# Altium PCB ELF 2 & ELF 2_Lite V1.3.PcbDoc (part 2 of 8)
Units mm, origin at the board's own origin, x right, y up, seen from the top; angles counter-clockwise.
Board outline 120 x 75 mm, 4 copper layers (01 TOP, 02 GND, 03 Signal, 04 BOT), stack 0.603 mm thick; 470 components, 412 nets, 2075 pads, 1565 vias.
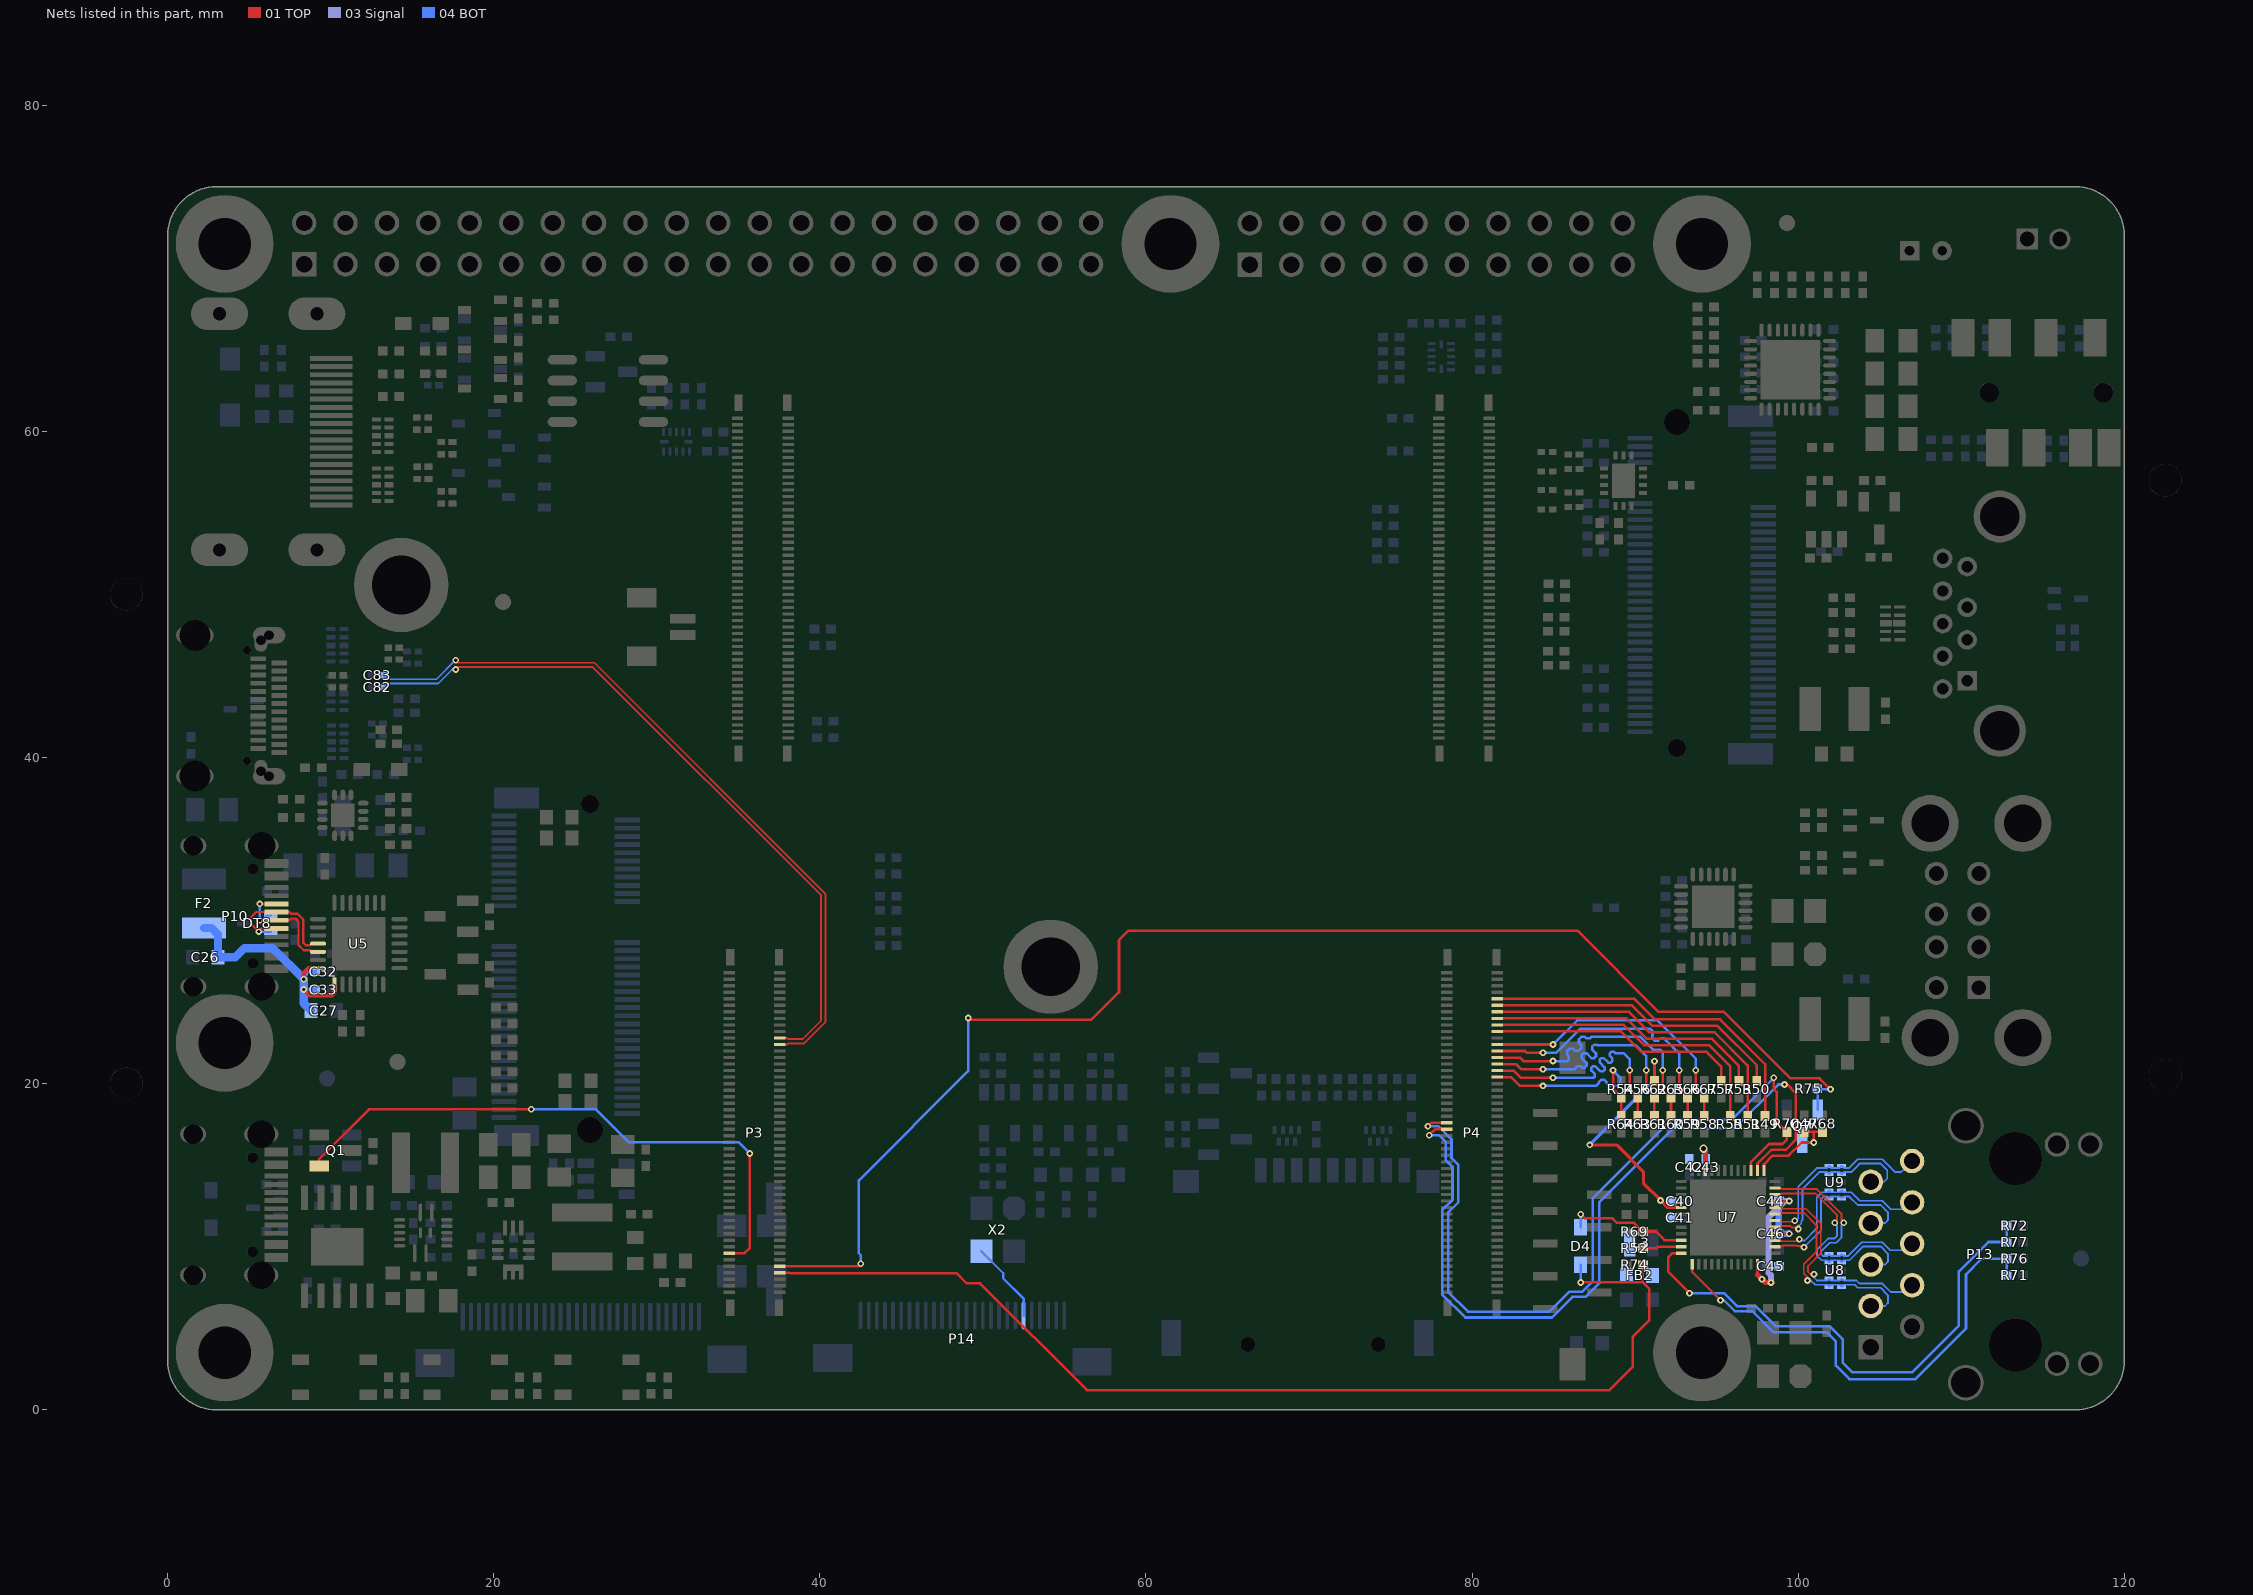
[diagram p4: the nets of this part, all layers, seen from the top]

## Footprints (in the part's own frame and the unit in brackets; to place one, negate y for a bottom-side part, rotate by r counter-clockwise, add the part's x,y. Pads: shape width x height; smd on the part's side, far side on the other; paste and mask are expansions set on the pad) (continued)
QFN48-0_4-6X6-PH1_0 [mm] "QFN, 48-Leads, Body 6.00x6.00mm, Pitch 0.40mm, Thermal Pad 4.80x4.80mm, IPC Medium Density"
  rect 0.65x0.2 smd mask+0.05: 1(-2.876,2.2) 2(-2.876,1.8) 3(-2.876,1.4) 4(-2.876,1) 5(-2.876,0.6) 6(-2.876,0.2) 7(-2.876,-0.2) 8(-2.876,-0.6) 9(-2.876,-1) 10(-2.876,-1.4) 11(-2.876,-1.8) 12(-2.876,-2.2) 25(2.876,-2.2) 26(2.876,-1.8) 27(2.876,-1.4) 28(2.876,-1) 29(2.876,-0.6) 30(2.876,-0.2) 31(2.876,0.2) 32(2.876,0.6) 33(2.876,1) 34(2.876,1.4) 35(2.876,1.8) 36(2.876,2.2)
  rect 0.2x0.65 smd mask+0.05: 13(-2.2,-2.875) 14(-1.8,-2.875) 15(-1.4,-2.875) 16(-1,-2.875) 17(-0.6,-2.875) 18(-0.2,-2.875) 19(0.2,-2.875) 20(0.6,-2.875) 21(1,-2.875) 22(1.4,-2.875) 23(1.8,-2.875) 24(2.2,-2.875) 37(2.2,2.875) 38(1.8,2.875) 39(1.4,2.875) 40(1,2.875) 41(0.6,2.875) 42(0.2,2.875) 43(-0.2,2.875) 44(-0.6,2.875) 45(-1,2.875) 46(-1.4,2.875) 47(-1.8,2.875) 48(-2.2,2.875)
  rect 4.65x4.65 smd mask+0.05: 49(0,0)
  silkscreen extent -4.2,-4.24 4.23,4.22, body extent -3.01,-3.01 3.01,3.01, height 0.85
QFN_2*3 [mm]
  rect 0.7x0.25 smd paste+0 mask+0.05: 1(-0.95,0.5) 2(-0.95,0) 3(-0.95,-0.5) 7(0.95,-0.5) 8(0.95,0) 9(0.95,0.5)
  rect 0.25x0.9 smd paste+0 mask+0.05: 4(-0.5,-1.35) 5(0,-1.35) 6(0.5,-1.35) 10(-0.5,1.35) 10(0,1.35) 10(0.5,1.35)
  rect 0.4x0.25 smd paste+0 mask+0.05: 8(0,0)
  rect 1.25x0.4 smd paste+0 mask+0.05: 10(0,1.1)
  silkscreen extent -1.78,-1.73 1.23,1.73
"QR Code" [mm]
  silkscreen extent -3.18,-3.18 3.18,3.18
RJ45_Gigabit [mm]
  rect 1.5x1.5 hole 1 mask+0.05: 1(5.715,-6.35)
  round 1.5 hole 1 mask+0.05: 2(4.445,-3.81) 3(3.175,-6.35) 4(1.905,-3.81) 5(0.635,-6.35) 6(-0.635,-3.81) 7(-1.905,-6.35) 8(-3.175,-3.81) 9(-4.445,-6.35) 10(-5.715,-3.81)
  round 1.5 hole 1.1 mask+0.05: 11(6.725,5.08) 12(6.725,7.11) 13(-6.725,5.08) 14(-6.725,7.11)
  round 2.2 hole 1.8 mask+0.05: SH1(7.875,-0.51) SH2(-7.875,-0.51)
  round 3.25 hole 3.25 unplated paste-2539.97 mask+0.05: ""(-5.875,2.54) ""(5.555,2.54)
  silkscreen extent -7.98,-8.01 7.98,13.34, body extent -8.12,-8.01 8.12,13.34, height 13.65
SOCKET_100PIN_0.4MM_F [mm]
  rect 0.2x0.7 smd mask+0.05: 1(-9.8,-1.55) 2(-9.8,1.55) 3(-9.4,-1.55) 4(-9.4,1.55) 5(-9,-1.55) 6(-9,1.55) 7(-8.6,-1.55) 8(-8.6,1.55) 9(-8.2,-1.55) 10(-8.2,1.55) 11(-7.8,-1.55) 12(-7.8,1.55) 13(-7.4,-1.55) 14(-7.4,1.55) 15(-7,-1.55) 16(-7,1.55) 17(-6.6,-1.55) 18(-6.6,1.55) 19(-6.2,-1.55) 20(-6.2,1.55) 21(-5.8,-1.55) 22(-5.8,1.55) 23(-5.4,-1.55) 24(-5.4,1.55) 25(-5,-1.55) 26(-5,1.55) 27(-4.6,-1.55) 28(-4.6,1.55) 29(-4.2,-1.55) 30(-4.2,1.55) 31(-3.8,-1.55) 32(-3.8,1.55) 33(-3.4,-1.55) 34(-3.4,1.55) 35(-3,-1.55) 36(-3,1.55) 37(-2.6,-1.55) 38(-2.6,1.55) 39(-2.2,-1.55) 40(-2.2,1.55) 41(-1.8,-1.55) 42(-1.8,1.55) 43(-1.4,-1.55) 44(-1.4,1.55) 45(-1,-1.55) 46(-1,1.55) 47(-0.6,-1.55) 48(-0.6,1.55) 49(-0.2,-1.55) 50(-0.2,1.55) 51(0.2,-1.55) 52(0.2,1.55) 53(0.6,-1.55) 54(0.6,1.55) 55(1,-1.55) 56(1,1.55) 57(1.4,-1.55) 58(1.4,1.55) 59(1.8,-1.55) 60(1.8,1.55) 61(2.2,-1.55) 62(2.2,1.55) 63(2.6,-1.55) 64(2.6,1.55) 65(3,-1.55) 66(3,1.55) 67(3.4,-1.55) 68(3.4,1.55) 69(3.8,-1.55) 70(3.8,1.55) 71(4.2,-1.55) 72(4.2,1.55) 73(4.6,-1.55) 74(4.6,1.55) 75(5,-1.55) 76(5,1.55) 77(5.4,-1.55) 78(5.4,1.55) 79(5.8,-1.55) 80(5.8,1.55) 81(6.2,-1.55) 82(6.2,1.55) 83(6.6,-1.55) 84(6.6,1.55) 85(7,-1.55) 86(7,1.55) 87(7.4,-1.55) 88(7.4,1.55) 89(7.8,-1.55) 90(7.8,1.55) 91(8.2,-1.55) 92(8.2,1.55) 93(8.6,-1.55) 94(8.6,1.55) 95(9,-1.55) 96(9,1.55) 97(9.4,-1.55) 98(9.4,1.55) 99(9.8,-1.55) 100(9.8,1.55)
  rect 1x0.5 smd mask+0.05: 101(-10.75,-1.5) 102(-10.75,1.5) 103(10.75,-1.5) 104(10.75,1.5)
  silkscreen extent -11.55,-2.97 11.55,2.97
SOD_123 [mm]
  rect 1.4x1.2 smd mask+0.05: 1(-1.714,0) 2(1.714,0)
  silkscreen extent -1.08,-1.14 1.88,1.25, body extent -1.85,-0.8 1.85,0.8, height 1.27
SOD_323 [mm]
  rect 1x0.8 smd mask+0.05: 1(-1.15,0) 2(1.15,0)
  silkscreen extent -1,-0.91 1.59,1.02, body extent -1.3,-0.67 1.3,0.67, height 1.1
SOD_323_D [mm]
  rect 1x0.8 smd mask+0.05: 1(-1.15,0) 2(1.15,0)
  silkscreen extent -1,-0.75 1.13,0.75, body extent -1.3,-0.67 1.3,0.67, height 1.1
SOP8_1.27-7.2x4-h2.65 [mm]
  oval 1.8x0.6 smd mask+0.05: 1(-2.794,1.905) 2(-2.794,0.635) 3(-2.794,-0.635) 4(-2.794,-1.905) 5(2.794,-1.905) 6(2.794,-0.635) 7(2.794,0.635) 8(2.794,1.905)
  silkscreen extent -3.03,-3.6 2,3.6
SOT323 [mm]
  rect 0.5x0.8 smd mask+0.05: 1(0.65,1.1) 2(-0.65,1.1) 3(0,-1.1)
  silkscreen extent -1.1,-0.67 1.1,0.69
SOT_233_N [mm]
  rect 1.2x0.65 smd mask+0.05: 1(-1,0.95) 2(-1,-0.95) 3(1,0)
  silkscreen extent -2.22,-1.46 1.14,1.46, body extent -1.26,-1.46 1.24,1.54, height 1.12
SOT_233_W [mm]
  rect 1.3x0.65 smd mask+0.05: 1(-1,0.95) 2(-1,-0.95) 3(1,0)
  silkscreen extent -2.3,-1.5 0.7,1.5, body extent -1.25,-1.5 1.25,1.5, height 1.12
SOT_235 [mm]
  rect 1x0.6 smd mask+0.05: 1(-1.25,0.95) 2(-1.25,0) 3(-1.25,-0.95) 4(1.25,-0.95) 5(1.25,0.95)
  silkscreen extent -1.71,-1.5 0.45,1.65, body extent -1.12,-1.45 1.22,1.47, height 1
SOT_323 [mm]
  rect 0.5x0.8 smd mask+0.05: 1(0.65,1.1) 2(-0.65,1.1) 3(0,-1.1)
  silkscreen extent -1.1,-0.67 1.1,0.67
SOT_523 [mm] "SOT23, 3-Leads, Body 1.7x1.8mm (max), Pitch 0.50mm, IPC Medium Density"
  rect 0.85x0.4 smd mask+0.051: 1(-0.825,0.5) 2(-0.825,-0.5) 3(0.825,0)
  silkscreen extent -1.84,-0.85 0.43,0.85, body extent -0.8,-0.8 0.8,0.8, height 0.8
TF_CARD_SELF [mm]
  rect 1.4x1.4 smd mask+0.05: 0(-8,4.688)
  rect 1.2x2.2 smd mask+0.05: 0(-7.75,-4.912) 0(7.75,-4.912)
  rect 1.6x1.4 smd mask+0.05: 0(6.85,4.688)
  rect 0.7x1.5 smd mask+0.05: 1(2.25,5.388) 2(1.15,5.388) 3(0.05,5.388) 4(-1.05,5.388) 5(-2.15,5.388) 6(-3.25,5.388) 7(-4.35,5.388) 8(-5.45,5.388) 9(-6.55,5.388)
  round 0.9 hole 0.9 unplated mask+0.051: ""(-4.95,-5.312) ""(3.05,-5.312)
  01 TOP pour cut-out: 3.023,-3.099 3.023,3.961 3.05,3.988 -6.9,3.988 -6.9,-3.099
  01 TOP pour cut-out: 4.229,-1.956 6.579,-1.956 6.579,3.124 4.305,3.124 4.229,3.124
  01 TOP pour cut-out: 6.35,-11.684 6.35,-2.718 6.325,-2.692 5.042,-2.692 5.042,-11.684
  silkscreen extent -7.37,-16.11 7.41,5.21, body extent -8.05,-9.31 8.05,5.69, height 1.9
UQFN [mm]
  rect 0.5x0.2 smd mask+0.05: 1(-0.6,0.8) 2(-0.6,0.4) 3(-0.6,0) 4(-0.6,-0.4) 5(-0.6,-0.8) 7(0.6,-0.8) 8(0.6,-0.4) 9(0.6,0) 10(0.6,0.4) 11(0.6,0.8)
  rect 0.2x0.5 smd mask+0.05: 6(0,-0.75) 12(0,0.75)
  01 TOP region: -0.85,0.7 -0.35,0.7 -0.35,1 -0.5,1 -0.5,0.9 -0.85,0.9
  silkscreen extent -1.54,-1.24 1.1,1.24, body extent -0.9,-1.05 0.9,1.05, height 0.55
USB3.0_A-11.78 [mm]
  round 3.2 hole 2.4 slot 2.3 at 90 deg mask+0.05: 0(-6.57,1.75) 0(6.57,1.75)
  rect 1.2x1.2 hole 0.7 mask+0.05: 1(3.5,-0.25)
  round 1.2 hole 0.7 mask+0.05: 2(1,-0.25) 3(-1,-0.25) 4(-3.5,-0.25) 5(-4,-1.75) 6(-2,-1.75) 7(0,-1.75) 8(2,-1.75) 9(4,-1.75)
  silkscreen extent -7.17,-2.97 7.17,13.53, body extent -8.04,-3.01 8.06,13.47, height 7.62
USB_A_F_W_2 [mm] "T_MMMC_896-43-008-90-000000"
  rect 1.4x1.4 hole 0.9 mask+0.05: 1(-3.5,-0.14)
  round 1.42 hole 0.92 mask+0.05: 2(-1,-0.14) 3(1,-0.14) 4(3.5,-0.14) 5(-3.5,2.46) 6(-1,2.46) 7(1,2.46) 8(3.5,2.46)
  round 3.5 hole 2.3 mask+0.05: 9(-6.57,-2.84) 10(6.57,-2.84) 11(-6.57,2.84) 12(6.57,2.84)
  silkscreen extent -6.38,-13.2 6.38,4.46, body extent -7.7,-13.27 7.7,4.26, height 16.17
USB_TYPE-C_S [mm]
  rect 0.55x1.45 smd mask+0.05: A1/B12(-3.225,2.548) A4/B9(-2.45,2.548) B1/A12(3.225,2.548) B4/A9(2.45,2.548)
  rect 0.3x1.45 smd mask+0.05: A5(-1.25,2.548) A6(-0.25,2.548) A7(0.25,2.548) A8(1.25,2.548) B5(1.75,2.548) B6(0.75,2.548) B7(-0.75,2.548) B8(-1.75,2.548)
  oval 1x2.1 hole 1.7 slot 0.6 at 0 deg mask+0.05: E1(-4.32,1.632) E2(4.32,1.632)
  oval 1x1.6 hole 1.2 slot 0.6 at 0 deg mask+0.05: E3(-4.32,-2.548) E4(4.32,-2.548)
  round 0.65 hole 0.65 unplated mask+0.05: H1(-2.89,1.102) H2(2.89,1.102)
  silkscreen extent -4.47,-5.15 4.47,0.25, body extent -4.47,-5.15 4.47,2.75, height 3.2
USB_TYPEC_SMT [mm] "韩国韩荣，TYPE-C-31-M-05"
  rect 0.3x0.95 smd mask+0.05: A1(-2.63,2.588) A2(-2.13,2.588) A3(-1.63,2.588) A4(-1.13,2.588) A5(-0.63,2.588) A6(-0.13,2.588) A7(0.37,2.588) A8(0.87,2.588) A9(1.37,2.588) A10(1.87,2.588) A11(2.37,2.588) A12(2.87,2.588) B1(2.62,1.288) B2(2.12,1.288) B3(1.62,1.288) B4(1.12,1.288) B5(0.62,1.288) B6(0.12,1.288) B7(-0.38,1.288) B8(-0.88,1.288) B9(-1.38,1.288) B10(-1.88,1.288) B11(-2.38,1.288) B12(-2.88,1.288)
  oval 1x2 hole 0.6 slot 1.6 at 90 deg mask+0.05: E1(-4.32,1.963) E2(4.32,1.963)
  oval 1.4x0.8 hole 0.6 slot 1.2 at 0 deg mask+0.05: E1(-4.02,1.462) E2(4.02,1.462)
  oval 1x2.3 hole 1.9 slot 0.6 at 0 deg mask+0.05: E3(-4.32,-2.588) E4(4.32,-2.588)
  round 0.5 hole 0.5 unplated mask+0.05: H1(-3.4,0.613) H2(3.4,0.613)
  silkscreen extent -4.47,-5.29 4.47,2.62
USON-10 [mm]
  rect 0.25x0.55 smd mask+0.05: 1(-1,-0.385) 2(-0.5,-0.385) 4(0.5,-0.385) 5(1,-0.385) 6(1,0.385) 7(0.5,0.385) 9(-0.5,0.385) 10(-1,0.385)
  rect 0.35x0.55 smd mask+0.05: 3(0,-0.385) 8(0,0.385)
  silkscreen extent -1.33,-1.11 1.33,0.57, body extent -1.25,-0.5 1.25,0.5, height 0.55
WQFN14_0.5_2.5x2.5 [mm] "QFN, 14-Leads, Body 2.50x2.50mm, Pitch 0.50mm, Thermal Pad 1.45x1.45mm, IPC Medium Density"
  oval 0.65x0.3 smd mask+0.05: 1(-1.25,0.5) 2(-1.25,0) 3(-1.25,-0.5) 8(1.25,-0.5) 9(1.25,0) 10(1.25,0.5)
  oval 0.3x0.65 smd mask+0.05: 4(-0.75,-1.25) 5(-0.25,-1.25) 6(0.25,-1.25) 7(0.75,-1.25) 11(0.75,1.25) 12(0.25,1.25) 13(-0.25,1.25) 14(-0.75,1.25)
  rect 1.45x1.45 smd mask+0.05: 15(0,0)
  silkscreen extent -1.91,-1.4 1.4,1.4, body extent -1.25,-1.25 1.25,1.25, height 0.15

## Part data
C1 C2: library part 1110205018, LatestRevisionDate=17-Jul-2002, LatestRevisionNote="Re-released for DXP Platform.", PackageDescription="Radial Cap, Thru-Hole; 2 Leads; 0.3 in Pin Spacing", PackageReference=RAD-0.3, Published=8-Jun-2000, Publisher="Altium Limited", 存货名称=贴装叠层陶瓷电容, 存货编码=1110205018, 序号=747, 料号建立日期=2019/7/2, 最近一次购买记录=2025/1/10, 禁用=否, 规格型号=1206,22uF,25V,±10％,X5R, 近三年购买频次=近三年购买频次.30
C3 C9 C13 C14 C15 C23 C24: library part 1110204012, LatestRevisionDate=17-Jul-2002, LatestRevisionNote="Re-released for DXP Platform.", PackageDescription="Radial Cap, Thru-Hole; 2 Leads; 0.3 in Pin Spacing", PackageReference=RAD-0.3, Published=8-Jun-2000, Publisher="Altium Limited", 存货名称=贴装叠层陶瓷电容, 存货编码=1110204012, 序号=747, 规格型号=0805,22uF,16V,±20％,X5R
  C3 C9 C13 C14 C15: 禁用状态=否
  C23 C24: 主计量单位名称=个, 安全库存=6299, 旧编码=010203017, 旧规格型号="0805 22uF 16V ±20％ X5R"
C4 C21 C25 C26 C27 C110 C123 C124: library part 1110203040, LatestRevisionDate=17-Jul-2002, LatestRevisionNote="Re-released for DXP Platform.", PackageDescription="Radial Cap, Thru-Hole; 2 Leads; 0.3 in Pin Spacing", PackageReference=RAD-0.3, Published=8-Jun-2000, Publisher="Altium Limited", 存货名称=贴装叠层陶瓷电容, 存货编码=1110203040, 序号=675, 规格型号=0603,22uF,6.3V,±20％,X5R
  C4 C21 C25 C26 C27 C110: 主计量单位名称=个, 安全库存=678357, 旧编码=010202048, 旧规格型号="0603 22uF 6.3V ±20％ X5R"
C5 C6 C7 C19 C53 C54 C55 C57 C61 C62 C76 C90 C92 C105 C106 C108 C109 C115 C116 C117 C142: library part 1110202021, LatestRevisionDate=17-Jul-2002, LatestRevisionNote="Re-released for DXP Platform.", PackageDescription="Radial Cap, Thru-Hole; 2 Leads; 0.3 in Pin Spacing", PackageReference=RAD-0.3, Published=8-Jun-2000, Publisher="Altium Limited", 存货名称=贴装叠层陶瓷电容, 存货编码=1110202021, 序号=600, 规格型号=0402,1uF,16V,±10％,X5R
C8 C118: library part 1110202042, LatestRevisionDate=17-Jul-2002, LatestRevisionNote="Re-released for DXP Platform.", PackageDescription="Radial Cap, Thru-Hole; 2 Leads; 0.3 in Pin Spacing", PackageReference=RAD-0.3, Published=8-Jun-2000, Publisher="Altium Limited", 存货名称=贴装叠层陶瓷电容, 存货编码=1110202042, 规格型号=0402,220nF,25V,±10％,X5R
C10: library part 1110203025, LatestRevisionDate=17-Jul-2002, LatestRevisionNote="Re-released for DXP Platform.", PackageDescription="Radial Cap, Thru-Hole; 2 Leads; 0.3 in Pin Spacing", PackageReference=RAD-0.3, Published=8-Jun-2000, Publisher="Altium Limited", 存货名称=贴装叠层陶瓷电容, 存货编码=1110203025, 序号=648, 描述=替代010202065, 料号建立日期=2019/7/2, 最近一次购买记录(更新至20231207）=2023/10/23, 禁用=#REF!, 规格型号=0603,1uF,25V,±10％,X5R, 近三年购买频次（更新至2023/12/7）=近三年购买频次,35
C11 C12 C17 C18 C20 C22 C28 C29 C35 C37 C39 C41 C43 C44 C45 C46 C47 C52 C77 C81 C91 C93 C95 C97 C99 C101 C113 C119 C120 C121 C128 C130 C131 C134 C135 C136 C137 C138 C139 C140 C143: library part 1110202039, LatestRevisionDate=17-Jul-2002, LatestRevisionNote="Re-released for DXP Platform.", PackageDescription="Radial Cap, Thru-Hole; 2 Leads; 0.3 in Pin Spacing", PackageReference=RAD-0.3, Published=8-Jun-2000, Publisher="Altium Limited", 存货名称=贴装叠层陶瓷电容, 存货编码=1110202039, 规格型号=0402,100nF,25V,±10％,X5R
  C11 C12 C17 C18 C20 C22 C28 C29 C35 C37 C39 C41 C43 C44 C45 C46 C47 C52 C77 C81 C91 C93 C95 C97 C99 C101 C113 C119 C120 C134 C140 C143: 序号=626
  C121 C128 C130 C131 C135 C136 C137 C138 C139: 序号=618, 禁用状态=否
C16 C71: library part 1110202016, LatestRevisionDate=17-Jul-2002, LatestRevisionNote="Re-released for DXP Platform.", PackageDescription="Radial Cap, Thru-Hole; 2 Leads; 0.3 in Pin Spacing", PackageReference=RAD-0.3, Published=8-Jun-2000, Publisher="Altium Limited", 存货名称=贴装叠层陶瓷电容, 存货编码=1110202016, 序号=587, 规格型号=0402,100pF,50V,±5％,NPO
C30 C33: library part 1110202002, LatestRevisionDate=17-Jul-2002, LatestRevisionNote="Re-released for DXP Platform.", PackageDescription="Radial Cap, Thru-Hole; 2 Leads; 0.3 in Pin Spacing", PackageReference=RAD-0.3, Published=8-Jun-2000, Publisher="Altium Limited", 主计量单位名称=个, 存货名称=贴装叠层陶瓷电容, 存货编码=1110202002, 安全库存=499709, 序号=571, 旧编码=010201002, 旧规格型号="0402 1uF 10V ±10％ X5R", 规格型号=0402,1uF,10V,±10％,X5R
C31 C32 C34 C50 C56 C58 C59 C60 C132 C133 C150 C151 C152 C153: library part 1110202001, LatestRevisionDate=17-Jul-2002, LatestRevisionNote="Re-released for DXP Platform.", PackageDescription="Radial Cap, Thru-Hole; 2 Leads; 0.3 in Pin Spacing", PackageReference=RAD-0.3, Published=8-Jun-2000, Publisher="Altium Limited", 存货名称=贴装叠层陶瓷电容, 存货编码=1110202001, 序号=570, 规格型号=0402,100nF,16V,±10％,X7R
  C31 C32 C34 C50 C56 C58 C59 C60 C150 C151 C152 C153: 主计量单位名称=个, 安全库存=2580445, 旧编码=010201001, 旧规格型号="0402 100nF 16V ±10％ X7R"
  C132 C133: 禁用状态=否
C36 C38 C40 C42 C94 C96 C98 C100 C112 C114: library part 1110202032, LatestRevisionDate=17-Jul-2002, LatestRevisionNote="Re-released for DXP Platform.", PackageDescription="Radial Cap, Thru-Hole; 2 Leads; 0.3 in Pin Spacing", PackageReference=RAD-0.3, Published=8-Jun-2000, Publisher="Altium Limited", 存货名称=贴装叠层陶瓷电容, 存货编码=1110202032, 序号=616, 规格型号=0402,4.7uF,10V,±10％,X5R
C48 C49: library part 1110202003, LatestRevisionDate=17-Jul-2002, LatestRevisionNote="Re-released for DXP Platform.", PackageDescription="Radial Cap, Thru-Hole; 2 Leads; 0.3 in Pin Spacing", PackageReference=RAD-0.3, Published=8-Jun-2000, Publisher="Altium Limited", 存货名称=贴装叠层陶瓷电容, 存货编码=1110202003, 序号=572, 禁用状态=否, 规格型号=0402,22pF,50V,±5％,NPO
C51: library part 1110203037, LatestRevisionDate=17-Jul-2002, LatestRevisionNote="Re-released for DXP Platform.", PackageDescription="Radial Cap, Thru-Hole; 2 Leads; 0.3 in Pin Spacing", PackageReference=RAD-0.3, Published=8-Jun-2000, Publisher="Altium Limited", 存货名称=贴装叠层陶瓷电容, 存货编码=1110203037, 序号=672, 规格型号=0603,10uF,10V,±20％,X5R
C63 C64 C65 C66 C67 C68 C69 C70: library part 1110201001, LatestRevisionDate=17-Jul-2002, LatestRevisionNote="Re-released for DXP Platform.", PackageDescription="Radial Cap, Thru-Hole; 2 Leads; 0.3 in Pin Spacing", PackageReference=RAD-0.3, Published=8-Jun-2000, Publisher="Altium Limited", 存货名称=贴装叠层陶瓷电容, 存货编码=1110201001, 序号=928, 规格型号=0201,220nF,6.3V,±20％,X5R
C72 C73: library part 1110201015, LatestRevisionDate=17-Jul-2002, LatestRevisionNote="Re-released for DXP Platform.", PackageDescription="Radial Cap, Thru-Hole; 2 Leads; 0.3 in Pin Spacing", PackageReference=RAD-0.3, Published=8-Jun-2000, Publisher="Altium Limited", 存货名称=贴装叠层陶瓷电容, 存货编码=1110201015, 规格型号=0201,1uF,10V,±20％,X5R
C74: library part 1110203058, LatestRevisionDate=17-Jul-2002, LatestRevisionNote="Re-released for DXP Platform.", PackageDescription="Radial Cap, Thru-Hole; 2 Leads; 0.3 in Pin Spacing", PackageReference=RAD-0.3, Published=8-Jun-2000, Publisher="Altium Limited", 存货名称=贴装叠层陶瓷电容, 存货编码=1110203058, 序号=707, 禁用状态=否, 规格型号=0603,10uF,10V,±10％,X5R
C75: library part 1110203001, LatestRevisionDate=17-Jul-2002, LatestRevisionNote="Re-released for DXP Platform.", PackageDescription="Radial Cap, Thru-Hole; 2 Leads; 0.3 in Pin Spacing", PackageReference=RAD-0.3, Published=8-Jun-2000, Publisher="Altium Limited", 存货名称=贴装叠层陶瓷电容, 存货编码=1110203001, 序号=628, 禁用状态=否, 规格型号=0603,100nF,50V,±10％,X7R
C78 C79 C80: library part 1110204014, LatestRevisionDate=17-Jul-2002, LatestRevisionNote="Re-released for DXP Platform.", PackageDescription="Radial Cap, Thru-Hole; 2 Leads; 0.3 in Pin Spacing", PackageReference=RAD-0.3, Published=8-Jun-2000, Publisher="Altium Limited", 存货名称=贴装叠层陶瓷电容, 存货编码=1110204014, 序号=751, 规格型号=0805,22uF,25V,±20％,X5R
C82 C83 C86 C87 C88 C89: library part 1110201009, LatestRevisionDate=17-Jul-2002, LatestRevisionNote="Re-released for DXP Platform.", PackageDescription="Radial Cap, Thru-Hole; 2 Leads; 0.3 in Pin Spacing", PackageReference=RAD-0.3, Published=8-Jun-2000, Publisher="Altium Limited", 存货名称=贴装叠层陶瓷电容, 存货编码=1110201009, 规格型号=0201,100nF,25V,±10％,X5R
C84 C85: library part 1110202017, LatestRevisionDate=17-Jul-2002, LatestRevisionNote="Re-released for DXP Platform.", PackageDescription="Radial Cap, Thru-Hole; 2 Leads; 0.3 in Pin Spacing", PackageReference=RAD-0.3, Published=8-Jun-2000, Publisher="Altium Limited", 存货名称=贴装叠层陶瓷电容, 存货编码=1110202017, 序号=588, 规格型号=0402,220pF,50V,±10％,X7R
C102 C103: library part 1110202045, LatestRevisionDate=17-Jul-2002, LatestRevisionNote="Re-released for DXP Platform.", PackageDescription="Radial Cap, Thru-Hole; 2 Leads; 0.3 in Pin Spacing", PackageReference=RAD-0.3, Published=8-Jun-2000, Publisher="Altium Limited", 存货名称=贴装叠层陶瓷电容, 存货编码=1110202045, 规格型号=0402,30pF,50V,±5%,NPO
C104 C107 C111 C122: library part 1110204008, LatestRevisionDate=17-Jul-2002, LatestRevisionNote="Re-released for DXP Platform.", PackageDescription="Radial Cap, Thru-Hole; 2 Leads; 0.3 in Pin Spacing", PackageReference=RAD-0.3, Published=8-Jun-2000, Publisher="Altium Limited", 存货名称=贴装叠层陶瓷电容, 存货编码=1110204008, 序号=711, 料号建立日期=2019/7/2, 最近一次购买记录(更新至20231207）=2023/11/15, 禁用=#REF!, 规格型号=0805,47uF,6.3V,±20％,X5R, 近三年购买频次（更新至2023/12/7）=近三年购买频次,41
C125 C127 C129: library part 1110203089, LatestRevisionDate=17-Jul-2002, LatestRevisionNote="Re-released for DXP Platform.", PackageDescription="Radial Cap, Thru-Hole; 2 Leads; 0.3 in Pin Spacing", PackageReference=RAD-0.3, Published=8-Jun-2000, Publisher="Altium Limited", 存货名称=贴装叠层陶瓷电容, 存货编码=1110203089, 序号=5456, 描述=FH/广东风华高新科技股份有限公司, 料号建立日期=2023/6/9, 最近一次购买记录(更新至20231207）=2023/11/8, 禁用=#REF!, 规格型号=0603,10uF,10V,±10％,X5R,0603X106K100NT, 近三年购买频次（更新至2023/12/7）=近三年购买频次,12
C126: library part 1110202014, LatestRevisionDate=17-Jul-2002, LatestRevisionNote="Re-released for DXP Platform.", PackageDescription="Radial Cap, Thru-Hole; 2 Leads; 0.3 in Pin Spacing", PackageReference=RAD-0.3, Published=8-Jun-2000, Publisher="Altium Limited", 存货名称=贴装叠层陶瓷电容, 存货编码=1110202014, 序号=593, 禁用状态=否, 规格型号=0402,10nF,50V,±10％,X7R
C141: library part 1110211010, LatestRevisionDate=17-Jul-2002, LatestRevisionNote="Re-released for DXP Platform.", PackageDescription="Polarized Capacitor (Radial); 2 Leads", PackageReference=RB7.6-15, Published=8-Jun-2000, Publisher="Altium Limited", 存货名称=贴装铝电解电容, 存货编码=1110211010, 序号=4743, 料号建立日期=2022/9/2, 最近一次购买记录=2024/12/25, 禁用=否, 规格型号=220uF,16V,6.3*7.7mm,CS1C221M-CRE77, 近三年购买频次=近三年购买频次.19
D2: library part 1110504013, LatestRevisionDate=17-Jul-2002, LatestRevisionNote="Re-released for DXP Platform.", PackageDescription="SM LED; 2 Flat Leads", PackageReference=3.2X1.6X1.1, PackageVersion=Feb-2002, Published=8-Jun-2000, Publisher="Altium Limited", 存货名称=贴装发光二极管, 存货编码=1110504013, 序号=1825, 禁用状态=否, 规格型号=0603,透明,翠绿色发光,普通亮度
D3: library part 1110501005, 存货名称=双肖特基二极管, 存货编码=1110501005, 安全库存=3634, 序号=2485, 旧编码=010601007, 旧规格型号=BAT54C，SOT-23-3, 规格型号=BAT54C,SOT-23-3
D4 D8: library part 1110501028, Code_JEDEC=DO-214-AA, LatestRevisionDate=17-Jul-2002, LatestRevisionNote="Re-released for DXP Platform.", PackageDescription="DO-214-AA/SMB; 2 C-Bend Leads; Body 5.3 x 3.6 mm, inc. leads (LxW)", PackageReference=SMB, Published=8-Jun-2000, Publisher="Altium Limited", 存货名称=肖特基二极管, 存货编码=1110501028, 序号=2525, 规格型号=BAT54HT1G,SOD323
D5: library part 1110501064, Code_JEDEC=DO-214-AA, LatestRevisionDate=17-Jul-2002, LatestRevisionNote="Re-released for DXP Platform.", PackageDescription="DO-214-AA/SMB; 2 C-Bend Leads; Body 5.3 x 3.6 mm, inc. leads (LxW)", PackageReference=SMB, Published=8-Jun-2000, Publisher="Altium Limited", 存货名称=肖特基二极管, 存货编码=1110501064, 规格型号=LMBR140ET1G,SOD323
D7: library part 1110501001, Code_JEDEC=DO-214-AA, LatestRevisionDate=17-Jul-2002, LatestRevisionNote="Re-released for DXP Platform.", PackageDescription="DO-214-AA/SMB; 2 C-Bend Leads; Body 5.3 x 3.6 mm, inc. leads (LxW)", PackageReference=SMB, Published=8-Jun-2000, Publisher="Altium Limited", 存货名称=肖特基二极管, 存货编码=1110501001, 序号=2480, 规格型号=MBR0540,SOD123
DT1: library part 1110503088, 存货名称=TVS管, 存货编码=1110503088, 序号=7697, 描述=LT品牌,替代1110503028, 料号建立日期=2024/12/6, 最近一次购买记录=2025/2/20, 禁用=否, 规格型号=PSD15C,SOD-323, 近三年购买频次=近三年购买频次.3
DT2 DT8 DT19 DT28 DT29 DT33: library part 1110503016, 存货名称=TVS管, 存货编码=1110503016, 序号=2598
  DT2 DT8 DT28 DT29: 主计量单位名称=只, 启用日期=2013/1/1, 安全库存=2084.00, 旧编码=010603010, 规格型号="RC1amp0502B SOT-523"
  DT19: 规格型号=RCLAMP0502B,SOT-523
  DT33: 主计量单位名称=只, 安全库存=1767, 旧编码=010603010, 旧规格型号="RC1amp0502B SOT-523", 规格型号=RC1amp0502B,SOT-523
DT3 DT11 DT12 DT13 DT15 DT16 DT35: library part 1110503052, 存货名称=TVS管, 存货编码=1110503052, 序号=4824, 禁用状态=否, 规格型号=ESD5341N-2/TR,0402TVS
DT4 DT5 DT6 DT7 DT14 DT17 DT22 DT23 DT24 DT25 DT26 DT27 DT31: library part 1110503036, 存货名称=TVS管, 存货编码=1110503036, 规格型号=ESD5451N-2/TR,DFN1006-2L
  DT4 DT5 DT6: 序号=1805, 禁用状态=否
  DT14 DT17 DT26 DT27 DT31: 禁用状态=否
DT9 DT10: library part 1110503004, 主计量单位名称=只, 存货名称=TVS管, 存货编码=1110503004, 安全库存=198, 序号=2555, 旧编码=010601080, 旧规格型号="PUSB3AB6Z xson7", 规格型号=PUSB3AB6Z,xson7
DT18 DT20 DT21 U8 U9 U13 U14: library part 1110503037, 存货名称=TVS管, 存货编码=1110503037, 规格型号=TPD4E05U06DQAR,USON
DT30: library part 1110405308, 存货名称=常规IC, 存货编码=1110405308, 描述栏信息=替代1110405144, 禁用状态=否, 规格型号=RClamp0524PATCT,DFN-10L
F2 F3 F4: library part 1110305006, LatestRevisionDate=17-Jul-2002, LatestRevisionNote="Re-released for DXP Platform.", PackageDescription="Thru-Hole; 2 Leads", PackageReference=PIN-W2/E2.8, Published=8-Jun-2000, Publisher="Altium Limited", 存货名称=自恢复保险, 存货编码=1110305006
  F2: 主计量单位名称=个, 启用日期=2013/1/1, 安全库存=4426.00, 序号=3432, 旧编码=010803008, 规格型号=1210，0.5A
  F3 F4: 序号=1038, 料号建立日期=2019/7/2, 最近一次购买记录(更新至20231207）=2023/12/5, 禁用=#REF!, 规格型号=1210,0.5A, 近三年购买频次（更新至2023/12/7）=近三年购买频次,37
F5: library part 1110305004, LatestRevisionDate=17-Jul-2002, LatestRevisionNote="Re-released for DXP Platform.", PackageDescription="Thru-Hole; 2 Leads", PackageReference=PIN-W2/E2.8, Published=8-Jun-2000, Publisher="Altium Limited", 存货名称=自恢复保险, 存货编码=1110305004, 序号=1036, 料号建立日期=2019/7/2, 最近一次购买记录(更新至20231207）=2023/12/5, 禁用=#REF!, 规格型号=1210,1A, 近三年购买频次（更新至2023/12/7）=近三年购买频次,4
FB1 FB2 FB6: library part 1110304011, 存货名称=磁珠, 存货编码=1110304011, 序号=1028
  FB1 FB6: 规格型号=0603,120ohm,500mA,WLCB1608-120Ω
  FB2: 主计量单位名称=只, 启用日期=2015/3/11, 安全库存=12837.00, 旧编码=010301092, 规格型号=0603，120ohm
FB3 FB4 FB5: library part 1110304009, 主计量单位名称=只, 存货名称=磁珠, 存货编码=1110304009, 安全库存=148, 序号=998, 描述栏信息=村田, 旧编码=010301062, 旧规格型号="0603 120Ohm 100MHz 2A BLM18PG121SN1 村田", 规格型号="0603,120 Ohm@100MHz,2A,BLM18PG121SN1"
K1 K2 K3: library part 1120105023, LatestRevisionDate=17-Jul-2002, LatestRevisionNote="Re-released for DXP Platform.", PackageDescription="Switch; 2 Leads", PackageReference=SPST-2, Published=24-Mar-1999, Publisher="Altium Limited", 存货名称=贴装按键开关, 存货编码=1120105023, 禁用=否, 规格型号=4P,4.6*3.2*2.5mm,白色,正按
L1: library part 1110301084, LatestRevisionDate=17-Jul-2002, LatestRevisionNote="Re-released for DXP Platform.", PackageDescription="Axial Device, Thru-Hole; 2 Leads; 0.9 in Pin Spacing", PackageReference=AXIAL-0.9, Published=24-Mar-1999, Publisher="Altium Limited", 存货名称=绕线电感, 存货编码=1110301084, 禁用状态=否, 规格型号=2.2uH,4*4*2mm,7.6A,平行焊盘,非屏蔽,WPN4020H2R2MT
L2: library part 1110301092, LatestRevisionDate=17-Jul-2002, LatestRevisionNote="Re-released for DXP Platform.", PackageDescription="Axial Device, Thru-Hole; 2 Leads; 0.9 in Pin Spacing", PackageReference=AXIAL-0.9, Published=24-Mar-1999, Publisher="Altium Limited", 存货名称=绕线电感, 存货编码=1110301092, 描述栏信息=Sunlord, 禁用状态=否, 规格型号=0.68uH±20%,4*4*2mm,11.1A/7.4A,平行焊盘,非屏蔽,WPN4020HR68MT
L3: library part 1110301085, LatestRevisionDate=17-Jul-2002, LatestRevisionNote="Re-released for DXP Platform.", PackageDescription="Axial Device, Thru-Hole; 2 Leads; 0.9 in Pin Spacing", PackageReference=AXIAL-0.9, Published=24-Mar-1999, Publisher="Altium Limited", 存货名称=绕线电感, 存货编码=1110301085, 序号=948, 禁用状态=否, 规格型号=2.2uH,2*1.6*1mm,2.15A,平行焊盘,非屏蔽,WPN201610H2R2MT
P5 P10: library part 1120102080, 存货名称=贴装USB座, 存货编码=1120102080, 序号=8624, 描述=深圳爱特姆, 规格型号=USB616FC-C2014245,USB2.0,type-c,母座,单层,横卧,16pin,(4个插装脚,脚长1.8),雾面
P7: library part 1120101221, 存货名称=贴装连接器, 存货编码=1120101221, 规格型号="Wafer 镀锡,单排,母座,2P,1.0mm,卧贴-WF10002-01206"
P8: library part 1120202208, 存货名称=插装USB座, 存货编码=1120202208, 禁用=否, 规格型号=USB3.0,母座,单层,横卧,富士康
P9: library part 1120201188, 存货名称=插槽, 存货编码=1120201188, 规格型号="M.2,0.5PITCH, H3,KEY E"
P11: library part 1120104005, 存货名称=贴装TF卡座, 存货编码=1120104005, 序号=2224, 禁用状态=否, 规格型号=TFP09-2-12B,自弹式单弹,外焊
P12: library part 1150303066, LatestRevisionDate=17-Jul-2002, LatestRevisionNote="Re-released for DXP Platform.", Publisher="Altium Limited", 存货名称=贴片螺母, 存货编码=1150303066, 规格型号=M2mm,长1.5mm
P13: library part 1120202201, 存货名称=插装网口座, 存货编码=1120202201, 描述=改外观替代1120202071, 禁用=否, 规格型号=HR851178A,RJ45,1000M,带灯,带变压器,无外围弹片,汉仁
P14: "010401124", 存货名称=FPC座, 存货编码=1120103021, 安全库存=1831.00, 序号=51, 旧编码=010401124, 规格型号=26P,0.5mm,下接翻盖
P15: "010401065", 存货名称=FPC座, 存货编码=1120103013, 安全库存=390.00, 序号=53, 旧编码=010401065, 规格型号=30P,0.5mm,下接翻盖
P16: library part 1120103051, 存货名称=FPC座, 存货编码=1120103051, 描述=艾诺康, 禁用=否, 规格型号=15P,1.0mm,抽屉式,贴片立式
P17: library part 1120202041, 存货名称=插装HDMI座, 存货编码=1120202041, 序号=2494, 描述=FCI生产编号:10029449,001RLF,与1120202030通用, 禁用状态=否, 规格型号=A型
P18: library part 1120102089, 存货名称=贴装USB座, 存货编码=1120102089, 规格型号="USB3.0,Type-C,母座,单层,横卧,脚长2mm,雾面,-25~+80℃ TYPEC-507DSW-ACP24F"
P19: library part 1120201007, LatestRevisionDate=17-Jul-2002, LatestRevisionNote="Re-released for DXP Platform.", Publisher="Altium Limited", 存货名称=插装连接器, 存货编码=1120201007, 序号=1261, 规格型号=PH,公头,2P,2.0mm,S
P20: library part 1120202094, 存货名称=话筒, 存货编码=1120202094, 序号=4063, 描述栏信息=咪头, 规格型号="6050-P 52DB 带引脚"
P21: library part 1120102026, "3.5mm音频4级耳机插座，SMT贴片黑色", 存货名称=贴装音频座, 存货编码=1120102026, 序号=2191, 禁用状态=否, 规格型号=PJ3930-8P,3.5mm,4级
P22: library part 1120202032, 存货名称=插装USB座, 存货编码=1120202032, 序号=1365, 规格型号=USB2.0,A型,母座,双层,横卧
P24: library part 1120201185, 存货名称=M.2插槽, 存货编码=1120201185, 规格型号="0.5PITCH,M.2, H4.2,KEY M"
P25: library part 1150303024, LatestRevisionDate=17-Jul-2002, LatestRevisionNote="Re-released for DXP Platform.", Publisher="Altium Limited", 存货名称=贴片螺母, 存货编码=1150303024, 序号=3308, 料号建立日期=2019/7/2, 最近一次购买记录(更新至20231207）=2023/12/5, 禁用=#REF!, 规格型号=M2mm,长2mm, 近三年购买频次（更新至2023/12/7）=近三年购买频次,73
P26: library part 1120201351, LatestRevisionDate=17-Jul-2002, LatestRevisionNote="Re-released for DXP Platform.", Publisher="Altium Limited", 存货名称=插装插针, 存货编码=1120201351, 禁用=否, 规格型号=双排,2*20P,2.54mm,S,镀金,塑胶是彩色,兼容树莓派
P28: library part 1120201363, LatestRevisionDate=17-Jul-2002, LatestRevisionNote="Re-released for DXP Platform.", Publisher="Altium Limited", 存货名称=插装插针, 存货编码=1120201363, 禁用=否, 规格型号=双排,2*10P,2.54mm,S,镀金
Q1: library part 1110502004, Code_JEDEC=TO-226-AA, LatestRevisionDate=17-Jul-2002, LatestRevisionNote="Re-released for DXP Platform.", PackageDescription="TO, Flat Index; 3 In-Line, Axial Leads; Body Dia. 4.8mm; Leads 0.55 x 0.51 mm (max)", PackageReference=TO-226-AA, Published=8-Jun-2000, Publisher="Altium Limited", 存货名称=三极管, 存货编码=1110502004, 序号=1754, 料号建立日期=2019/7/2, 最近一次购买记录(更新至20231207）=2023/11/29, 禁用=#REF!, 规格型号=S8550,SOT23-3,PNP, 近三年购买频次（更新至2023/12/7）=近三年购买频次,26
Q2: library part 1110502003, Code_JEDEC=TO-226-AA, LatestRevisionDate=17-Jul-2002, LatestRevisionNote="Re-released for DXP Platform.", PackageDescription="TO, Flat Index; 3 In-Line, Axial Leads; Body Dia. 4.8mm; Leads 0.55 x 0.51 mm (max)", PackageReference=TO-226-AA, Published=8-Jun-2000, Publisher="Altium Limited", 存货名称=三极管, 存货编码=1110502003, 序号=1753, 料号建立日期=2019/7/2, 最近一次购买记录(更新至20231207）=2023/10/19, 禁用=#REF!, 规格型号=S8050,SOT23-3,NPN, 近三年购买频次（更新至2023/12/7）=近三年购买频次,31
Q3: library part 1110505019, ComponentLink1Description="Manufacturer Link", ComponentLink1URL=http://www.irf.com/, DatasheetVersion=PD-9.814, LatestRevisionDate=17-Jul-2002, LatestRevisionNote="Re-released for DXP Platform.", Note="Pin 2 is electrically connected to pin 4.", PackageDescription="TO, Thru-Hole, Vertical, Heatsink Mounted; 3 In-Line Leads; Pitch 2.54 mm", PackageReference=TO-220AB, PackageVersion=Feb-1997, Published=8-Jun-2000, Publisher="Altium Limited", 存货名称=场效应管, 存货编码=1110505019, 序号=2675, 规格型号=AO3401,SOT-23-3,P沟道
Q4 Q5 Q6 Q7: library part 1110505035, DatasheetVersion=PD-9.814, LatestRevisionDate=17-Jul-2002, LatestRevisionNote="Re-released for DXP Platform.", Note="Pin 2 is electrically connected to pin 4.", PackageDescription="TO, Thru-Hole, Vertical, Heatsink Mounted; 3 In-Line Leads; Pitch 2.54 mm", PackageReference=TO-220AB, PackageVersion=Feb-1997, Published=8-Jun-2000, Publisher="Altium Limited", 存货名称=场效应管, 存货编码=1110505035, 序号=5012, 描述=替代1110505027, 禁用状态=否, 规格型号=CQA34N00,SOT23,N沟道
Q8 Q9 Q14 Q15 Q16: library part 1110505029, DatasheetVersion=PD-9.814, LatestRevisionDate=17-Jul-2002, LatestRevisionNote="Re-released for DXP Platform.", Note="Pin 2 is electrically connected to pin 4.", PackageDescription="TO, Thru-Hole, Vertical, Heatsink Mounted; 3 In-Line Leads; Pitch 2.54 mm", PackageReference=TO-220AB, PackageVersion=Feb-1997, Published=8-Jun-2000, Publisher="Altium Limited", 存货名称=场效应管, 存货编码=1110505029, 序号=4061, 描述=替代1110505016, 禁用状态=否, 规格型号=L2SK3018WT1G,SOT-323
Q10 Q11 Q12 Q13: library part 1110505033, DatasheetVersion=PD-9.814, LatestRevisionDate=17-Jul-2002, LatestRevisionNote="Re-released for DXP Platform.", Note="Pin 2 is electrically connected to pin 4.", PackageDescription="TO, Thru-Hole, Vertical, Heatsink Mounted; 3 In-Line Leads; Pitch 2.54 mm", PackageReference=TO-220AB, PackageVersion=Feb-1997, Published=8-Jun-2000, Publisher="Altium Limited", 存货名称=场效应管, 存货编码=1110505033, 序号=4825, 禁用状态=否, 规格型号=WNM6002,SOT_323,N沟道
R1 R2 R3 R4 R5 R6 R9 R10 R11 R12 R13 R14 R122 R123 R180 R181 R182 R183 R184 R185 R186 R187 R188 R189: library part 1110102038, 存货名称=贴装电阻, 存货编码=1110102038, 规格型号=0402,2.2K,±1％
  R1 R2 R3 R4 R5 R6 R9 R10 R11 R12 R13 R14 R180 R181 R182 R183 R184 R185 R186 R187 R188 R189: 序号=58, 料号建立日期=2019/7/2, 最近一次购买记录(更新至20231207）=2023/11/28, 禁用=否, 近三年购买频次（更新至2023/12/7）=近三年购买频次,47
  R122 R123: 序号=51
R7 R8 R20 R52 R54 R56 R62 R65 R66 R67 R68 R69 R70 R71 R72 R74 R95 R102 R113 R114 R115 R155 R167: library part 1110102003, 存货名称=贴装电阻, 存货编码=1110102003, 规格型号=0402,4.7K,±5％
  R7 R8 R20 R95 R155 R167: 序号=23, 料号建立日期=2019/7/2, 最近一次购买记录(更新至20231207）=2023/11/21, 禁用=#REF!, 近三年购买频次（更新至2023/12/7）=近三年购买频次,59
  R52 R54 R56 R62 R65 R66 R67 R68 R69 R70 R71 R72 R74 R102 R113 R114 R115: 序号=12
R15 R28 R30 R31 R33 R38 R45 R47 R48 R75 R78 R79 R80 R81 R83 R121 R125 R132 R134 R137 R149 R150 R151: library part 1110102007, 存货名称=贴装电阻, 存货编码=1110102007, 规格型号=0402,10K,±5％
  R15 R28 R30 R31 R33 R38 R45 R47 R48 R75 R78 R79 R80 R81 R83 R121 R125 R132 R134: 序号=17
  R137 R149 R150 R151: 序号=27, 禁用状态=否
R16 R19: library part 1110102255, 存货名称=贴装电阻, 存货编码=1110102255, 序号=5781, 描述=FH/广东风华高新科技股份有限公司, 料号建立日期=2023/10/16, 最近一次购买记录=2025/2/12, 禁用=否, 规格型号=0402,0Ω,±1％,风华, 近三年购买频次=近三年购买频次.14
R17: library part 1110102069, 存货名称=贴装电阻, 存货编码=1110102069, 序号=89, 料号建立日期=2019/7/2, 最近一次购买记录(更新至20231207）=2023/11/22, 禁用=#REF!, 规格型号=0402,2K,±1％, 近三年购买频次（更新至2023/12/7）=近三年购买频次,70
R18: library part 1110102092, 存货名称=贴装电阻, 存货编码=1110102092, 序号=112, 料号建立日期=2019/7/2, 最近一次购买记录(更新至20231207）=2023/11/29, 禁用=#REF!, 规格型号=0402,22K,±5％, 近三年购买频次（更新至2023/12/7）=近三年购买频次,1
R21: library part 1110103252, 存货名称=贴装电阻, 存货编码=1110103252, 禁用状态=否, 规格型号=0603,3.65M,±1％
R22: library part 1110102061, 存货名称=贴装电阻, 存货编码=1110102061, 序号=79, 规格型号=0402,150K,±1％
R23 R26 R100 R101 R106 R124 R126 R127 R140 R141 R142: library part 1110102004, 存货名称=贴装电阻, 存货编码=1110102004, 规格型号=0402,100K,±5％
  R23: 主计量单位名称=只, 安全库存=129124, 序号=14, 旧编码=010101005, 旧规格型号="0402-100K ±5％"
  R26 R100 R101 R106 R124 R126 R127: 序号=14
  R140 R141 R142: 序号=24, 禁用状态=否
R24 R25 R27 R36 R135: library part 1110102074, 存货名称=贴装电阻, 存货编码=1110102074, 规格型号=0402,20K,±1％
  R24 R36: 序号=106
  R25 R27: 序号=94, 料号建立日期=2019/7/2, 最近一次购买记录(更新至20231207）=2021/12/27, 禁用=否, 近三年购买频次（更新至2023/12/7）=近三年购买频次,3
  R135: 序号=94, 禁用状态=否
R29: library part 1110102049, 存货名称=贴装电阻, 存货编码=1110102049, 序号=63, 规格型号=0402,200K,±1％
R32: library part 1110102127, 存货名称=贴装电阻, 存货编码=1110102127, 序号=164, 规格型号=0402,44.2K,±1％
R34 R35: library part 1110102136, 存货名称=贴装电阻, 存货编码=1110102136, 规格型号=0402,5.1K,±1％
R37 R84 R103 R130: library part 1110102011, 存货名称=贴装电阻, 存货编码=1110102011, 序号=21, 规格型号=0402,1K,±1％
R39 R40 R41 R42 R43 R44 R46 R49 R50 R51 R53 R55 R57 R58 R59 R60 R61 R63 R64 R128 R129 R131 R133: library part 1110102028, 存货名称=贴装电阻, 存货编码=1110102028, 序号=41, 规格型号=0402,22Ω,±5％
R73: library part 1110102182, 存货名称=贴装电阻, 存货编码=1110102182, 描述栏信息=厚声, 规格型号=0402,2.49K,±1％
R76 R77: library part 1110102043, 存货名称=贴装电阻, 存货编码=1110102043, 序号=56, 规格型号=0402,330Ω,±5％
R82 R85: library part 1110102185, 存货名称=贴装电阻, 存货编码=1110102185, 描述栏信息=厚声, 规格型号=0402,1.8K,±5％
R86 R87 R88 R89 R90 R91 R92 R93: library part 1110101007, 存货名称=贴装电阻, 存货编码=1110101007, 规格型号=0201,470Ω,±1％
R94: library part 1110102085, 存货名称=贴装电阻, 存货编码=1110102085, 序号=119, 规格型号=0402,27K,±5％
R96 R97 R99: library part 1110102040, 存货名称=贴装电阻, 存货编码=1110102040, 序号=53, 规格型号=0402,47K,±5％
R98: library part 1110102012, 存货名称=贴装电阻, 存货编码=1110102012, 序号=22, 规格型号=0402,1.2K,±1％
R104 R105: library part 1110101020, 存货名称=贴装电阻, 存货编码=1110101020, 规格型号=0201,2.2M,±1％
R107 R108 R138 R139 R143 R144 R146 R147 R148 R152: library part 1110102176, 存货名称=贴装电阻, 存货编码=1110102176, 禁用状态=否, 规格型号=0402,2.2Ω,±1％
  R107 R108: 序号=196
R109 R110 R111 R112: library part 1110101001, 存货名称=贴装电阻, 存货编码=1110101001, 序号=556, 规格型号=0201,0Ω,±5%
R116 R117 R118 R119 R120: library part 1110102027, 存货名称=贴装电阻, 存货编码=1110102027, 序号=38, 规格型号=0402,33Ω,±5％
R136: library part 1110102037, 存货名称=贴装电阻, 存货编码=1110102037, 序号=57, 禁用状态=否, 规格型号=0402,10K,±1％
R145: library part 1110102192, 存货名称=贴装电阻, 存货编码=1110102192, 序号=4302, 禁用状态=否, 规格型号=0402,2.7K,±1%
R153 R154 R156 R157 R158 R159 R160 R161 R162 R163 R164: library part 1110102001, 存货名称=贴装电阻, 存货编码=1110102001, 规格型号=0402,0Ω,±5％
  R153 R154 R156 R158 R159 R160 R161 R162 R163 R164: 序号=10
  R157: 序号=21, 料号建立日期=2019/7/2, 最近一次购买记录(更新至20231207）=2023/9/25, 禁用=否, 近三年购买频次（更新至2023/12/7）=近三年购买频次,65
R165 R166 R172 R173: library part 1110101027, 存货名称=贴装电阻, 存货编码=1110101027, 规格型号=0201,49.9Ω,±1％
R168 R169 R170 R171: library part 1110101032, 存货名称=贴装电阻, 存货编码=1110101032, 序号=4737, 料号建立日期=2022/9/2, 最近一次购买记录(更新至20231207）=2023/9/6, 禁用=否, 规格型号=0201,33Ω,±5%, 近三年购买频次（更新至2023/12/7）=近三年购买频次,3
U1 U12 U18: library part 1110404097, 存货名称=电源, 存货编码=1110404097, 序号=2093, 规格型号=RT9013-18GB,SOT-23-5
U2: library part 1110405668, 存货名称=常规IC, 存货编码=1110405668, 序号=8408, 规格型号="CH224A ESSOP10,PD等多快充协议受电芯片,支持 PD3.2,BC1.2"
U3: library part 1110404112, 存货名称=电源, 存货编码=1110404112, 安全库存=105, 旧规格型号=MP8765GQ,QFN16, 规格型号=MP8765GQ,QFN16
U4: library part 1110404132, 存货名称=电源, 存货编码=1110404132, 规格型号=MP2147GD,QFN2×3mm
U5: library part 1110405282, 存货名称=常规IC, 存货编码=1110405282, 序号=1643, 描述=替代1110405210, 禁用状态=否, 规格型号=CP2102N-A02-G,QFN28
U6: library part 1110405188, 存货名称=常规IC, 存货编码=1110405188, 序号=1549, 描述="不推荐新品设计使用,1110405328改版替代,爱普生 时钟模块", 禁用状态=否, 规格型号=RX8010SJ,SO-8
U7: library part 1110405363, 存货名称=常规IC, 存货编码=1110405363, 序号=4251, 描述=替代1110405358, 禁用状态=否, 规格型号=RTL8211FSI-CG,QFN48
U10: library part 1110404122, 存货名称=电源, 存货编码=1110404122, 序号=1340, 料号建立日期=2019/11/23, 最近一次购买记录=2024/12/19, 禁用=否, 规格型号=XC6227C121MR-G,SOT_25, 近三年购买频次=近三年购买频次.8
U11: library part 1110404096, 存货名称=集成电路, 存货编码=1110404096, 安全库存=2574, 序号=2092, 旧编码=010504174, 旧规格型号=RT9013-28GB, 规格型号=RT9013-28GB
U15: library part 1110404183, 存货名称=电源, 存货编码=1110404183, 序号=4794, 料号建立日期=2022/10/14, 最近一次购买记录=2025/2/8, 禁用=否, 规格型号=SGM2588CYN5G/TR,SOT-23-5, 近三年购买频次=近三年购买频次.19
U16: library part 1110405272, 存货名称=常规IC, 存货编码=1110405272, 规格型号=FUSB302BMPX,WQFN-14
U17: library part 1110405394, 存货名称=常规IC, 存货编码=1110405394, 规格型号=NAU88C22YG,QFN32
U19: library part 1110404126, 存货名称=电源, 存货编码=1110404126, 描述栏信息=替代1110404068，备件为1110404151, 规格型号=SGM2034-3.3YN3G/TR,SOT-23-3
U20: library part 1110405348, 存货名称=常规IC, 存货编码=1110405348, 规格型号=FE1.1s-BQFN24BT,QFN-24,工业级
U21: library part 1110405372, 存货名称=常规IC, 存货编码=1110405372, 序号=4269, 描述=Microchip/美国微芯, 料号建立日期=2022/1/11, 最近一次购买记录(更新至20231207）=2023/10/17, 禁用=否, 规格型号="DSC557-0344FL1,14-Lead 2.5 mm x 3.2 mm QFN,–40°C to +105°C", 近三年购买频次（更新至2023/12/7）=近三年购买频次,11
U23 U24: library part 1110405038, 主计量单位名称=片, 存货名称=常规IC, 存货编码=1110405038, 安全库存=2609, 序号=1916, 旧编码=010503063, 旧规格型号=LSF0204RUTR, 规格型号=LSF0204RUTR
X1: library part 1110601037, 存货名称=贴装晶振, 存货编码=1110601037, 序号=3392, 规格型号=无源,25MHZ,4P,3.2*2.5mm,±20ppm,20pf
X2: library part 1110601007, 存货名称=贴装晶振, 存货编码=1110601007, 序号=3406, 规格型号=有源,24MHZ,4P,3.2*2.5mm,3.3V,±20ppm
X3: library part 1110601032, 存货名称=贴装晶振, 存货编码=1110601032, 序号=3377, 规格型号=无源,12MHZ,4P,3.2*2.5mm,±20ppm,20pf
M1 M2 M3 M4 M16 M17: 存货编码=0, 安全库存=0, 序号=32, 旧编码=MHOLE
M9 M10 M11 M12 M13 M14: 存货编码=0, 安全库存=0, 序号=35, 旧编码=MHOLE

## Via types
v1: diameter 0.406, hole 0.203, 01 TOP to 04 BOT, tented both sides, 1349 vias
v2: diameter 0.508, hole 0.305, 01 TOP to 04 BOT, tented both sides, 173 vias
v3: diameter 0.6, hole 0.3, 01 TOP to 04 BOT, tented both sides, 34 vias
v4: diameter 0.6, hole 0.3, 01 TOP to 04 BOT, 9 vias

## Nets (pads, with @x,y where several pads share a name; then routed paths per layer and width w, separated by ;. In a path a pad name is that pad's centre, name@x,y a point inside that pad or via, vN(x,y) a via of type N, cw(c..) or ccw(c..) an arc to the next point about the centre after c; other vN are vias at no path point)
CAM1_MCLK: P14.21 X2.3 | length 5
  04 BOT w0.156: X2.3@49.907,9.713 51.247,8.373 51.247,8.056 52.491,6.812 P14.21@52.491,5.78
CARRIER_EN: P3.87 Q1.2 | length 36.4
  01 TOP w0.156: Q1.2@9.3,14.95 9.3,15.385 12.339,18.424 v1(22.309,18.424) ; P3.87@34.45,9.6 35.378,9.6 35.702,9.925 v1(35.702,15.719)
  04 BOT w0.156: v1(22.309,18.424) 26.263,18.424 28.269,16.417 35.004,16.417 v1(35.702,15.719)
DEBUG_5V: C26.2 C27.2 C32.2 C33.2 F2.2 U5.7 U5.8 | length 16.5
  01 TOP w0.254: v1(8.349,25.772) 8.709,25.412 10.076,25.412 10.222,25.558 U5.8@10.222,26.082 ; v1(8.349,26.402) 8.349,26.783 8.648,27.082 U5.7@9.222,27.082
  04 BOT w0.254: v1(8.349,25.772) C33.2@9.049,25.772 ; v1(8.349,26.402) 8.349,26.579 8.641,26.872 C32.2@9.049,26.872
  04 BOT w0.508: F2.2@2.227,29.55 2.695,29.55 3.091,29.154 C26.2@3.091,27.748 4.147,27.748 4.699,28.3 6.451,28.3 v1(8.349,26.402) v1(8.349,25.772) 8.349,24.924 C27.2@8.793,24.48
DEBUG_D_N: DT8.1 P10.A7 P10.B7 U5.5 | length 8.1
  01 TOP w0.142: v1(5.649,30.02) P10.A7@6.68,30.02 7.48,30.02 7.583,30.123 7.838,30.123 8.031,29.929 8.031,28.507 8.353,28.185 8.718,28.185 8.821,28.082 U5.5@9.222,28.082 ; v1(5.649,31.02) P10.B7@6.68,31.02
  04 BOT w0.142: v1(5.649,31.02) v1(5.649,30.02) 5.781,30.02 6.085,30.324 DT8.1@6.325,30.324
DEBUG_D_P: DT8.2 P10.A6 P10.B6 U5.4 | length 8.9
  01 TOP w0.142: P10.B6@6.68,29.52 5.777,29.52 v1(5.58,29.324) 5.58,29.348 5.148,29.78 5.148,30.238 5.431,30.52 P10.A6@6.68,30.52 7.47,30.52 7.572,30.417 7.96,30.417 8.326,30.051 8.326,28.629 8.475,28.48 8.716,28.48 8.819,28.583 U5.4@9.222,28.583
  04 BOT w0.142: v1(5.58,29.324) DT8.2@6.325,29.324
DP_TX_AUX_N: C83.1 P3.24 | length 44.9
  01 TOP w0.109: v1(17.671,45.956) 17.819,45.807 26.181,45.807 40.338,31.651 40.338,23.762 39.045,22.469 38.056,22.469 37.987,22.4 P3.24@37.55,22.4
  04 BOT w0.109: C83.1@13.211,45.045 13.455,44.801 16.488,44.801 17.643,45.956 v1(17.671,45.956)
DP_TX_AUX_P: C82.1 P3.22 | length 43.9
  01 TOP w0.109: v1(17.671,45.397) 17.819,45.546 26.073,45.546 40.076,31.543 40.076,23.87 38.937,22.731 38.056,22.731 37.987,22.8 P3.22@37.55,22.8
  04 BOT w0.109: C82.1@13.211,44.295 13.455,44.539 16.596,44.539 17.454,45.397 v1(17.671,45.397)
ETH0_AVDDL: C44.2 C45.2 C46.2 FB2.2 U7.4 U7.9 U7.47 | length 12.4
  01 TOP w0.156: U7.4@98.576,10.8 v1(99.446,10.8) ; U7.9@98.576,12.8 v1(99.446,12.8)
  01 TOP w0.203: 97.5,8.289 U7.47@97.5,8.925
  01 TOP w0.305: 97.5,8.289 v1@97.779,8.01 ; v1(97.779,8.004) 97.983,7.8 v1(98.329,7.8)
  03 Signal w0.381: v1(98.329,7.8) 98.329,8.257 98.181,8.406 98.181,11.82 99.161,12.8 v1(99.446,12.8)
  04 BOT w0.381: v1(99.446,10.8) C46.2@98.808,10.8 C44.2@98.808,12.8 v1(99.446,12.8)
ETH0_DVDDL: C42.2 C43.2 FB2.1 L3.2 U7.22 | length 1.4
  01 TOP w0.203: U7.22@94.3,14.675 94.3,15.123
  01 TOP w0.305: v2(94.186,16.014) 94.3,15.9 94.3,15.123
ETH0_INT_B: D4.2 R69.2 U7.34 | length 7.6
  01 TOP w0.156: v1(86.66,11.998) 86.926,11.731 88.617,11.731 88.883,11.464 89.936,11.464 R69.2@90.47,10.931 91.263,10.931 91.794,10.4 U7.34@92.824,10.4
  04 BOT w0.156: D4.2@86.66,11.192 v1(86.66,11.998)
ETH0_LED1/CFG_LDO0: R72.1 R77.1 U7.36 | length 32.2
  01 TOP w0.156: U7.36@92.824,9.6 92.288,9.6 92.015,9.327 92.015,8.467 v1(93.332,7.15)
  04 BOT w0.156: v1(93.332,7.15) 95.444,7.15 96.234,6.36 97.383,6.36 98.631,5.112 101.936,5.112 102.739,4.309 102.739,2.88 103.324,2.295 106.98,2.295 109.855,5.17 109.855,8.486 111.656,10.287 R77.1@112.776,10.287 R77.1@112.776,10.287 R72.1@112.775,11.298
ETH0_LED2/CFG_LDO1: R71.1 R76.1 U7.37 | length 29.4
  01 TOP w0.156: U7.37@93.5,8.925 93.5,8.451 v1(95.235,6.717)
  04 BOT w0.156: v1(95.235,6.717) 95.441,6.717 96.107,6.052 97.178,6.052 98.488,4.741 101.765,4.741 102.307,4.198 102.307,2.715 103.143,1.879 107.177,1.879 110.288,4.991 110.288,8.307 111.252,9.271 R76.1@112.776,9.271 R71.1@112.776,8.255
ETH0_PHYADDR0: R52.1 U7.35 | length 2.4
  01 TOP w0.156: R52.1@90.47,9.915 91.314,9.915 91.399,10 U7.35@92.824,10
ETH0_RESET_B: C47.2 Q7.3 R68.2 U7.13 | length 6.4
  01 TOP w0.156: U7.13@97.9,14.675 97.9,15.054 98.434,15.588 99.414,15.588 100.214,16.388 v1(100.944,16.388) 100.944,17.023 100.932,17.036 ; C47.2@100.373,17.036 100.932,17.036 ; R68.2@101.49,17.036 100.932,17.036
  04 BOT w0.156: Q7.3@100.256,16.388 v1(100.944,16.388)
ETH0_TRX0_N: P13.8 U7.3 U9.2 U9.9 | length 11.7
  01 TOP w0.109: U7.3@98.576,10.4 98.949,10.4 99.018,10.331 99.947,10.331 v1(100.071,10.455)
  04 BOT w0.109: v1(100.071,10.455) 100.145,10.381 v1@100.18,10.381 ; v1@100.181,10.381 100.391,10.381 101.138,11.129 101.138,13.031 101.441,13.334 101.776,13.334 U9.2@101.896,13.453 102.015,13.334 102.546,13.334 U9.9@102.666,13.453 102.785,13.334 103.244,13.334 103.761,12.817 105.158,12.817 105.677,12.299 106.564,12.299 P13.8@106.98,12.715
ETH0_TRX0_P: P13.7 U7.2 U9.1 U9.10 | length 11.6
  01 TOP w0.109: U7.2@98.576,10 98.949,10 99.018,10.069 99.877,10.069 99.901,10.045 100.241,10.045 100.255,10.059 100.262,10.059 v1(100.35,9.971)
  04 BOT w0.109: v1(100.35,9.971) 101.4,11.021 101.4,12.923 101.55,13.073 101.776,13.073 U9.1@101.896,12.953 102.015,13.073 102.546,13.073 U9.10@102.666,12.953 102.785,13.073 103.136,13.073 103.653,12.556 105.05,12.556 105.501,12.105 105.501,11.627 105.318,11.445 P13.7@104.44,11.445
ETH0_TRX1_N: P13.10 U7.6 U9.5 U9.6 | length 12
  01 TOP w0.109: U7.6@98.576,11.6 98.949,11.6 99.018,11.531 99.796,11.531 99.796,11.572 v1(99.778,11.591)
  04 BOT w0.109: v1(99.778,11.591) 99.857,11.591 100.004,11.738 100.004,13.665 101.173,14.834 101.776,14.834 U9.5@101.896,14.953 102.015,14.834 102.546,14.834 U9.6@102.666,14.953 102.785,14.834 103.13,14.834 103.653,15.357 105.158,15.357 105.941,14.575 106.3,14.575 P13.10@106.98,15.255
ETH0_TRX1_P: P13.9 U7.5 U9.4 U9.7 | length 11.8
  01 TOP w0.109: U7.5@98.576,11.2 98.949,11.2 99.018,11.269 99.52,11.269 99.608,11.181 v1@99.948,11.181
  04 BOT w0.109: v1(100.011,11.083) 100.011,11.244 100.188,11.421 100.188,11.552 100.265,11.63 100.265,13.557 101.281,14.573 101.776,14.573 U9.4@101.896,14.453 102.015,14.573 102.546,14.573 U9.7@102.666,14.453 102.785,14.573 103.238,14.573 103.761,15.096 105.05,15.096 105.46,14.686 105.46,14.184 105.261,13.985 P13.9@104.44,13.985
ETH0_TRX2_N: P13.4 U7.8 U8.2 U8.9 | length 13.9
  01 TOP w0.109: U7.8@98.576,12.4 98.949,12.4 99.018,12.331 100.474,12.331 101.374,11.431 101.374,9.59 100.596,8.813 100.596,8.475 100.753,8.318 v1(100.963,8.318)
  04 BOT w0.109: v1(100.963,8.318) 100.963,8.108 101.147,7.924 101.776,7.924 U8.2@101.896,8.043 102.015,7.924 102.546,7.924 U8.9@102.666,8.043 102.785,7.924 103.575,7.924 103.761,7.737 105.158,7.737 105.672,7.223 106.568,7.223 P13.4@106.98,7.635
ETH0_TRX2_P: P13.3 U7.7 U8.1 U8.10 | length 13.8
  01 TOP w0.109: U7.7@98.576,12 98.949,12 99.018,12.069 100.366,12.069 101.112,11.323 101.112,9.698 100.335,8.921 100.335,8.367 100.568,8.133 v1(100.568,7.923)
  04 BOT w0.109: v1(100.568,7.923) 100.778,7.923 101.039,7.662 101.776,7.662 U8.1@101.896,7.543 102.015,7.662 102.546,7.662 U8.10@102.666,7.543 102.785,7.662 103.466,7.662 103.653,7.476 105.05,7.476 105.501,7.025 105.501,6.547 105.318,6.365 P13.3@104.44,6.365
ETH0_TRX3_N: P13.6 U7.11 U8.5 U8.6 | length 14.6
  01 TOP w0.109: U7.11@98.576,13.6 98.949,13.6 99.018,13.531 101.143,13.531 102.644,12.03 102.644,11.613 v1(102.792,11.464)
  04 BOT w0.109: v1(102.792,11.464) 102.644,11.316 102.644,10.56 102.321,10.237 101.935,10.237 101.407,9.71 101.407,9.55 101.533,9.424 101.776,9.424 U8.5@101.896,9.543 102.015,9.424 102.546,9.424 U8.6@102.666,9.543 102.785,9.424 103.034,9.424 103.888,10.277 105.158,10.277 105.652,9.783 106.588,9.783 P13.6@106.98,10.175
ETH0_TRX3_P: P13.5 U7.10 U8.4 U8.7 | length 14.6
  01 TOP w0.109: U7.10@98.576,13.2 98.949,13.2 99.018,13.269 101.035,13.269 102.382,11.921 102.382,11.613 v1(102.234,11.464)
  04 BOT w0.109: v1(102.234,11.464) 102.382,11.316 102.382,10.669 102.212,10.499 101.826,10.499 101.145,9.818 101.145,9.441 101.424,9.162 101.776,9.162 U8.4@101.896,9.043 102.015,9.162 102.546,9.162 U8.7@102.666,9.043 102.785,9.162 103.143,9.162 103.996,10.016 105.05,10.016 105.501,9.565 105.501,9.087 105.318,8.905 P13.5@104.44,8.905
ETH0_VDDIO_1.8V: C40.2 C41.2 R62.2 U7.29 | length 15.6
  01 TOP w0.203: v1(87.219,16.24) 88.857,16.24 90.507,14.59 90.507,13.883 v1(91.554,12.836) 91.99,12.4 U7.29@92.824,12.4 ; R62.2@91.181,20.151 v1(91.181,21.37)
  04 BOT w0.203: v1(87.219,16.24) 91.181,20.202 v1(91.181,21.37)
GMAC0_INT: D4.1 P3.94 R74.1 | length 67.6
  01 TOP w0.156: P3.94@37.55,8.4 38.117,8.4 38.154,8.363 48.4,8.363 49.007,7.756 49.821,7.756 56.374,1.203 88.412,1.203 89.856,2.646 89.856,4.479 90.851,5.474 90.851,7.426 90.47,7.807 ; v1(86.66,7.807) 90.47,7.807 ; R74.1@90.47,8.899 90.47,7.807
  04 BOT w0.156: v1(86.66,7.807) D4.1@86.66,8.892
GMAC0_MDC_M0: P4.49 U7.14 | length 49.8
  01 TOP w0.156: v1(77.365,16.839) 77.726,17.2 P4.49@78.45,17.2 ; U7.14@97.5,14.675 97.5,15.091 98.353,15.944 99.238,15.944 99.839,16.545 99.839,19.438 99.329,19.948 v1(99.156,19.948)
  04 BOT w0.156: v1(77.365,16.839) 77.977,16.839 78.372,16.444 78.372,15.317 78.796,14.893 78.796,12.876 78.165,12.245 78.165,7.077 79.584,5.657 84.888,5.657 86.152,6.922 86.954,6.922 87.802,7.769 87.802,12.739 92.337,17.275 96.104,17.275 98.778,19.948 v1(99.156,19.948)
GMAC0_MDIO_M0: P4.47 R70.2 U7.15 | length 49.6
  01 TOP w0.156: v1(77.289,17.392) 77.496,17.6 P4.47@78.45,17.6 ; U7.15@97.1,14.675 97.1,15.188 98.209,16.297 99.024,16.297 99.306,16.579 R70.2@99.306,17.036 98.675,17.667 98.675,19.487 98.496,19.666 v1(98.496,20.354)
  04 BOT w0.156: v1@77.295,17.386 77.929,17.386 78.735,16.58 78.735,15.428 79.159,15.004 79.159,12.726 78.527,12.095 78.527,7.227 79.734,6.02 84.737,6.02 85.949,7.231 86.751,7.231 87.387,7.867 87.387,12.966 92.198,17.777 95.919,17.777 v1(98.496,20.354)
GMAC0_RESET: P3.92 Q7.2 R75.2 | length 86.1
  01 TOP w0.156: P3.92@37.55,8.8 42.355,8.8 v1(42.515,8.959) ; v1(49.093,24.028) 49.217,23.904 56.632,23.904 58.344,25.616 58.344,28.804 58.922,29.382 86.46,29.382 91.439,24.402 95.439,24.402 99.52,20.321 101.305,20.321 v1(101.979,19.646)
  04 BOT w0.156: v1(42.515,8.959) 42.515,9.474 42.39,9.599 42.39,14.059 49.093,20.762 v1(49.093,24.028) ; Q7.2@101.206,18.388 101.206,19.646 v1(101.979,19.646)
GMAC0_RXCLK_M0: P4.34 R54.1 R64.1 | length 12.2
  01 TOP w0.156: P4.34@81.55,20.4 82.397,20.4 82.937,19.86 v1(84.348,19.86) ; v1(88.641,20.811) 88.641,19.7 89.149,19.192 R54.1@89.149,19.135 R64.1@89.149,18.017
  04 BOT w0.156: v1(84.348,19.86) 87.523,19.86 87.601,19.86 87.755,20.014 87.755,20.078 87.909,20.231 88.114,20.231 88.267,20.078 88.267,20.014 88.421,19.86 88.539,19.86 88.886,19.86 89.098,20.072 89.098,20.354 v1(88.641,20.811)
GMAC0_RXCTL_M0: P4.32 R56.1 R63.1 | length 15.2
  01 TOP w0.156: P4.32@81.55,20.8 82.547,20.8 82.979,20.368 v1(84.961,20.368) ; v1(89.657,20.811) 89.657,19.643 R56.1@90.165,19.135 R63.1@90.165,18.017
  04 BOT w0.156: v1(84.961,20.368) 87.461,20.368 87.472,20.38 87.528,20.435 87.528,20.588 87.309,20.806 87.309,20.959 87.411,21.061 87.563,21.061 87.876,20.748 88.029,20.748 88.131,20.849 88.131,21.002 87.818,21.315 87.818,21.468 87.919,21.569 88.072,21.569 88.352,21.289 88.505,21.289 88.607,21.391 88.607,21.543 88.447,21.703 88.447,21.856 88.548,21.958 88.701,21.958 88.806,21.853 89.2,21.853 89.305,21.853 89.657,21.501 v1(89.657,20.811)
GMAC0_RXD0_M0: P4.30 R61.1 R62.1 | length 15.9
  01 TOP w0.156: P4.30@81.55,21.2 82.697,21.2 83.021,20.876 v1(84.348,20.876) ; v1(90.673,20.811) 90.673,19.643 R62.1@91.181,19.135 R61.1@91.181,18.017